# Altium PCB da12_v100.PcbDoc (part 3 of 5)
Units mil, origin at the board's own origin, x right, y up, seen from the top; angles counter-clockwise.
Board outline 4646.03 x 3622.4 mil, 4 copper layers (Top Layer, GND, POWER, Bottom Layer), stack 23.756 mil thick; 376 components, 191 nets, 1000 pads, 352 vias.
Unrouted connection lines stored in the file: 152.
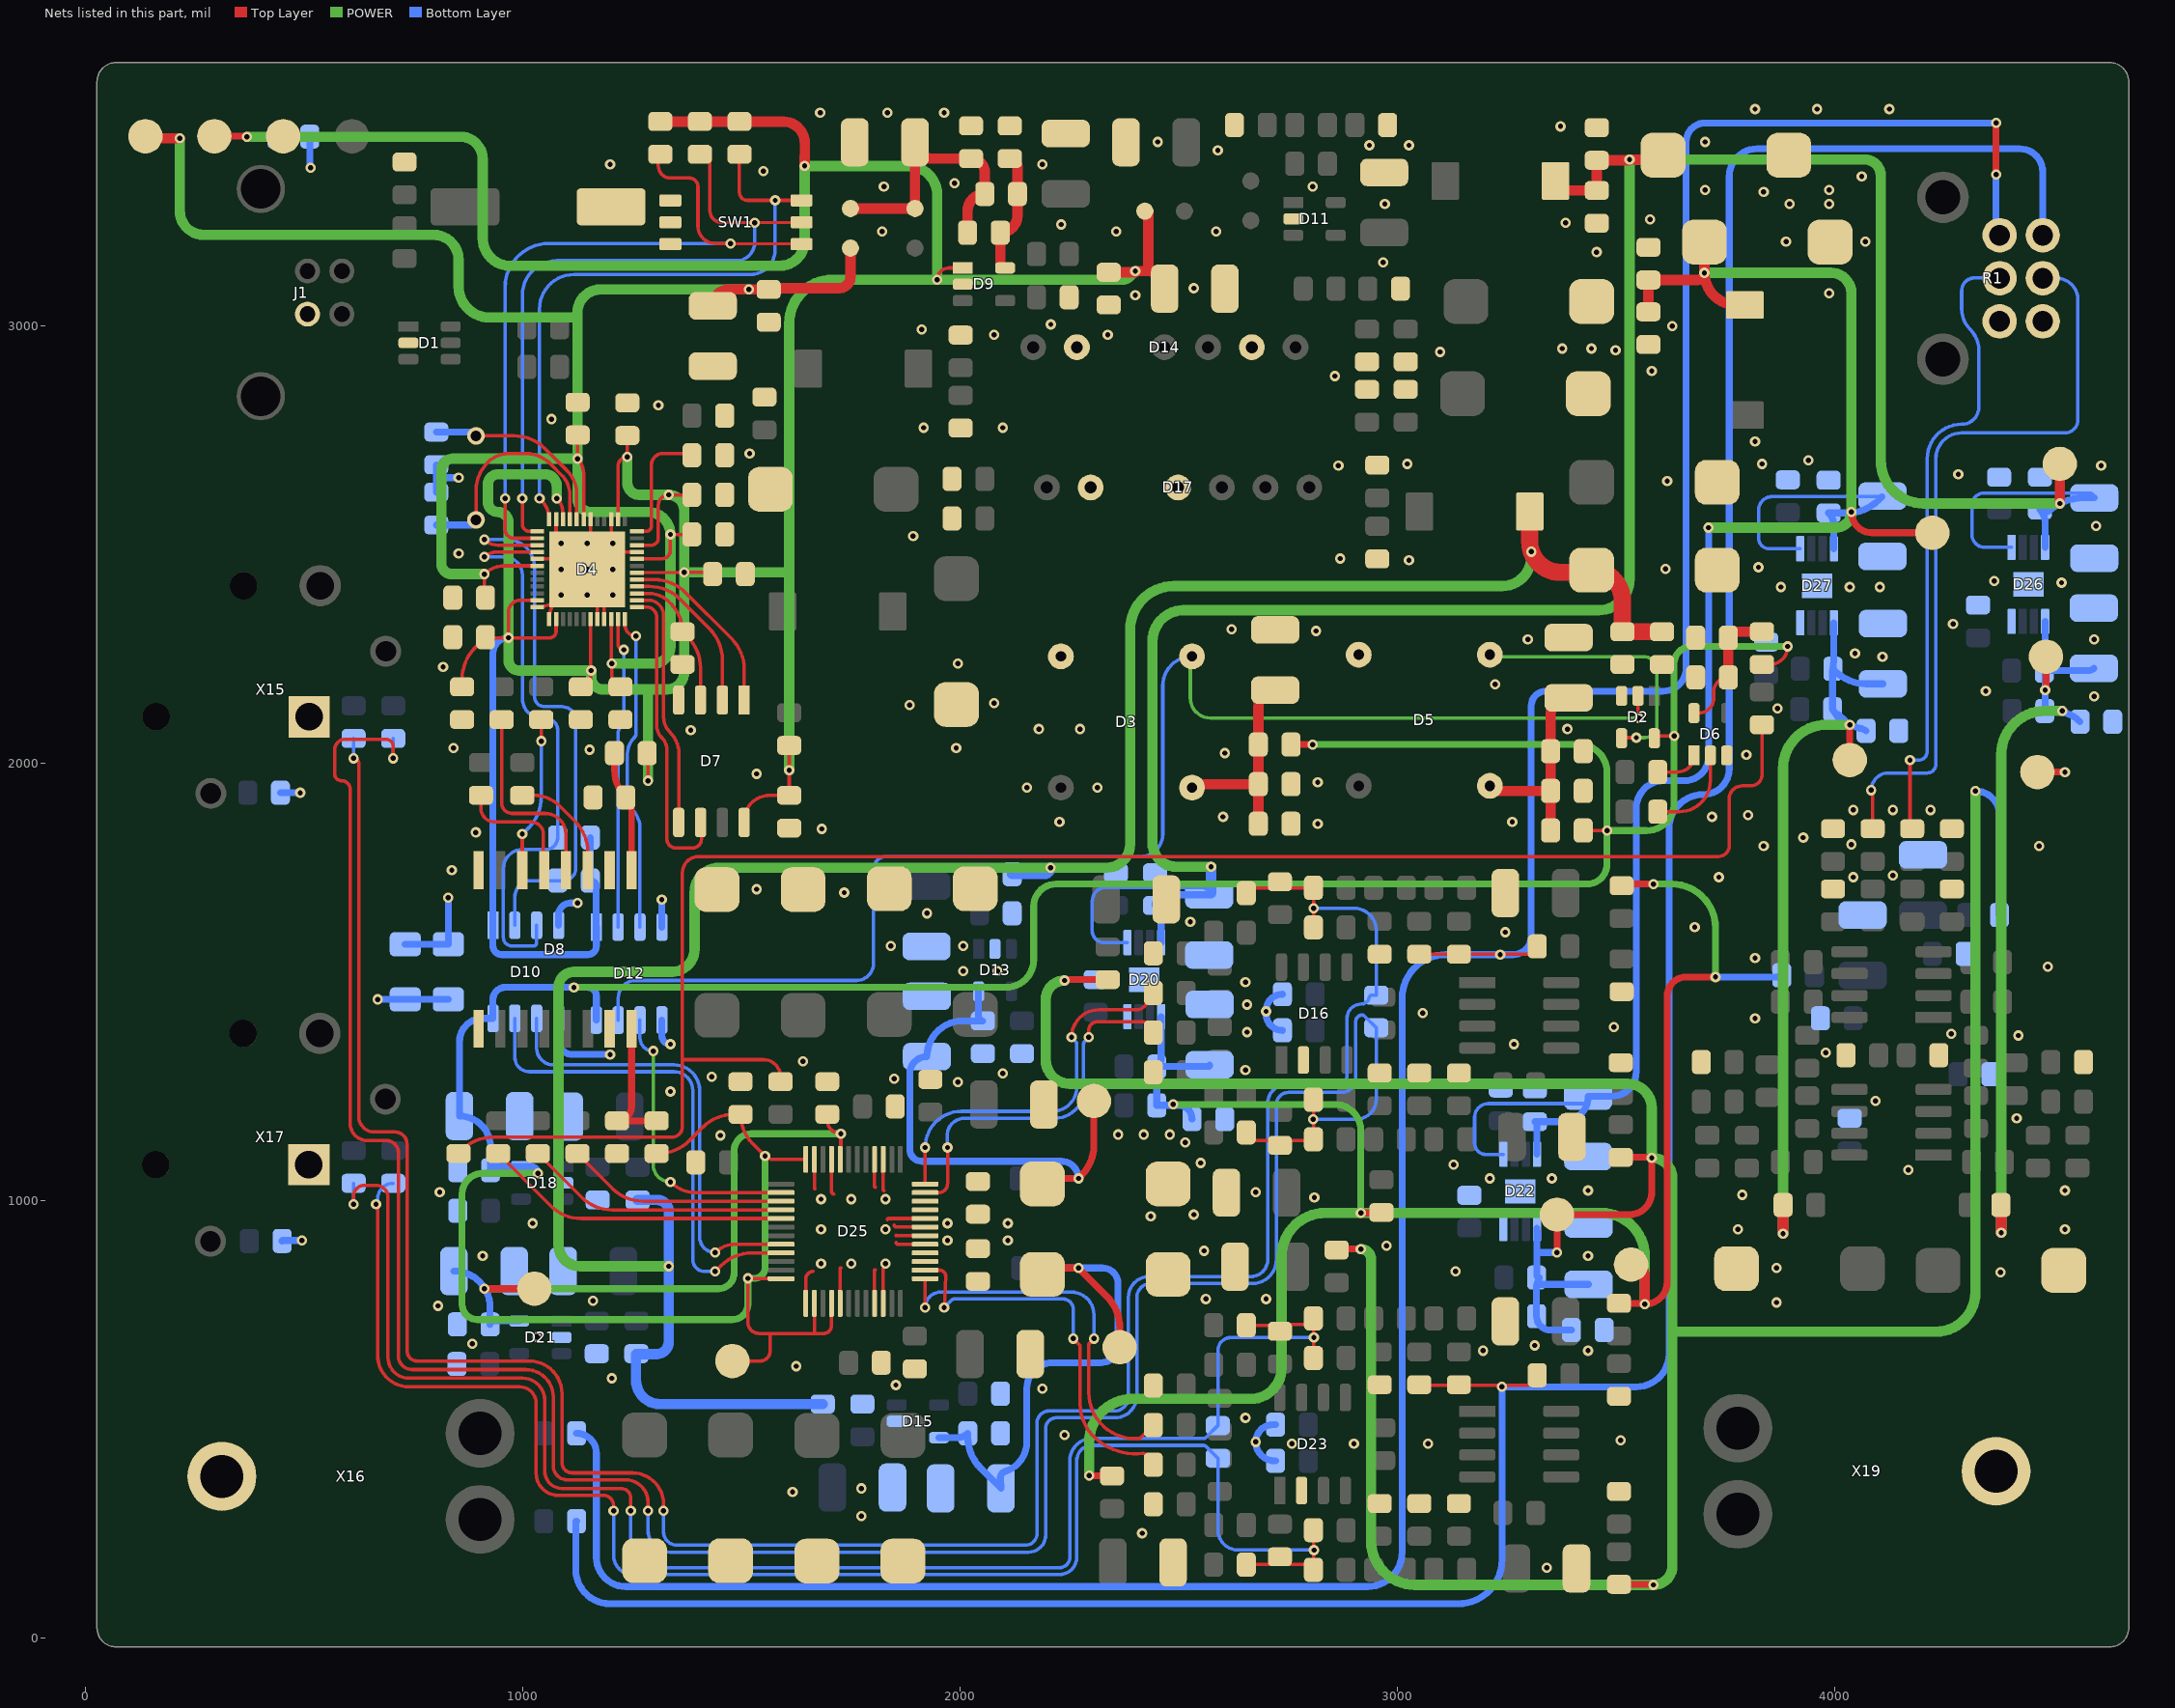
[diagram p4: the nets of this part, all layers, seen from the top]

## Part data (continued)
R85 R89 R92 R93 R94 R96: "Chip Resistor Surface Mount 0805 100 Ом", Case Code (Imperial)=0805, Case Code (Metric)=2012, Manufacturer 1=Yageo, Max Operating Temperature=155°C, Max Power Dissipation=125mW, Min Operating Temperature=-55°C, Resistance=100R, Resistance Tolerance=5%, Resistor Type="Thick Film", Temperature Coefficient=100ppm/°C, Voltage Rating=150V, Case/Package=0805, Category="Chip SMD Resistors", Contact Plating=Tin,Matte,Lead, Features="Moisture Resistant", Lead Free="Lead Free", Manufacturer Part Number 1=RC0805JR-07100RL, Mount=SMT, Number of Terminations=2, Packaging="Tape and Reel", Power Rating=125mW, Pricing 1="5000=0,00202, 10000=0,00199, 20000=0,00193 (USD)", Radiation Hardening=No, REACH SVHC=Unknown, RoHS=Yes, RoHS Compliant=Yes, Series=RC, Size Code=0805, Stock 1=585000, Supplier 1=Avnet, Supplier Part Number 1=RC0805JR-07100RL, Termination=SMD/SMT, Tolerance=5%, Type=Резистор
R91 R95: "Chip Resistor Surface Mount 0805 0 Ом", Case Code (Imperial)=0805, Case Code (Metric)=2012, Manufacturer 1=Yageo, Max Operating Temperature=155°C, Max Power Dissipation=125mW, Min Operating Temperature=-55°C, Resistance=0mR, Resistance Tolerance=5%, Resistor Type="Thick Film", Supplier Part Number 1=311-0.0ARCT-ND, Temperature Coefficient=200ppm/°C, Voltage Rating=150V, Case/Package=0805, Category="Chip SMD Resistors", ComponentLink1Description=https://datasheet.ciiva.com/7941/1738694-7941861.pdf?src-supplier=Element14, ComponentLink1URL=https://datasheet.ciiva.com/7941/1738694-7941861.pdf?src-supplier=Element14, ComponentLink2Description=https://datasheet.ciiva.com/11819/0900766b8106beab-11819430.pdf?src-supplier=RSComponents, ComponentLink2URL=https://datasheet.ciiva.com/11819/0900766b8106beab-11819430.pdf?src-supplier=RSComponents, ComponentLink3Description=https://datasheet.ciiva.com/7941/1738694-7941862.pdf?src-supplier=Element14, ComponentLink3URL=https://datasheet.ciiva.com/7941/1738694-7941862.pdf?src-supplier=Element14, ComponentLink4Description=https://datasheet.ciiva.com/7941/1738694-7941863.pdf?src-supplier=Element14, ComponentLink4URL=https://datasheet.ciiva.com/7941/1738694-7941863.pdf?src-supplier=Element14, ComponentLink5Description=https://datasheet.ciiva.com/15190/getdatasheetpartid-330685-15190028.pdf?src-supplier=Verical, ComponentLink5URL=https://datasheet.ciiva.com/15190/getdatasheetpartid-330685-15190028.pdf?src-supplier=Verical, Construction=Rectangular, Contact Plating=Tin,Matte, Depth=1.25mm, Features="Moisture Resistant", Height=0.5mm, Lead Free="Lead Free", Length=2mm, Manufacturer Part Number 1=RC0805JR-070RL, Military Standard=Not, Mount=SMT, Number of Pins=2, Number of Terminations=2, Packaging="Tape and Reel", Power Rating=125mW, Pricing 1="1=0,10000, 10=0,03100, 25=0,02240, 50=0,01720, 100=0,01260, 250=0,00964, 500=0,00770, 1000=0,00567 (USD)", Radiation Hardening=No, REACH SVHC=Unknown, RoHS=Yes, RoHS Compliant=Yes, Series=RC, Size Code=0805, Stock 1=3016838, Supplier 1=Digi-Key, Technology="THICK FILM", Termination=SMD/SMT, Tolerance=5%, Type=Резистор, Voltage Rating (DC)=150V, Width=1.25mm
SW1: library part CMP-011-00012-1, "WS-DISV 1.27 mm small compact SMD Dip Switch with top tape", ComponentLink1Description="Manufacturer URL", ComponentLink1URL=http://www.we-online.com, ComponentLink2Description=Datasheet, ComponentLink2URL=http://katalog.we-online.de/em/datasheet/4161311608xx.pdf, Pins=6
X1 X2 X3 X4 X5 X6 X8 X9 X10 X11 X12 X13 X14 X20 X21: "Контрольная площадка", Case/Package=SMD-1, Mount=SMT, Type="Точка контрольная"
  X1 X9 X10: Marck-2=5V0
  X2: Marck-2=1V2
  X3 X6 X8: Marck-2=3V3
  X4: Marck-2=DGND
  X5: Marck-2=AGND
  X11: Marck-2=6V0
  X12: Marck-2=-6V0
  X13: Marck-2=9V0
  X14: Marck-2=-9V0
  X20 X21: Marck-2="\"*\""
X7: library part HC-49, "Описание свойств компонента"
X15 X17: library part NC3FAAH2, "Описание свойств компонента"
X16 X19: library part ST-008G-04, "Описание свойств компонента"

## Via types
v1: diameter 23.62, hole 11.81, Top Layer to Bottom Layer, tented both sides, 218 vias
v2: diameter 23.62, hole 11.81, Top Layer to Bottom Layer, 134 vias

## Nets (pads, with @x,y where several pads share a name; then routed paths per layer and width w, separated by ;. In a path a pad name is that pad's centre, name@x,y a point inside that pad or via, vN(x,y) a via of type N, cw(c..) or ccw(c..) an arc to the next point about the centre after c; other vN are vias at no path point)
AOUT_LN: D25.35 R50.1 | length 858
  Top Layer w7.87: D25.35@1920.87,1018.78 1951.85,1018.78 ccw(c1951.85,1039.37) 1972.44,1039.37 v1(1972.44,1122.05) ; v1(2295.28,1374.02) 2295.28,1389.76 cw(c2314.96,1389.76) 2314.96,1409.45 2418.39,1409.45 cw(c2418.39,1384.92) R50.1@2442.91,1384.92
  Bottom Layer w7.87: v1(1972.44,1122.05) 1971.68,1146.52 ccw(c1963.81,1146.27) 1971.67,1146.71 cw(c2011.45,1149.12) 2011.45,1188.98 2218.4,1188.98 ccw(c2218.4,1254.04) 2283.46,1254.04 2283.46,1358.94 cw(c2291.34,1358.94) 2285.77,1364.51 v1(2295.28,1374.02)
AOUT_LP: D25.36 R35.1 | length 872.7
  Top Layer w7.87: D25.36@1920.87,1038.46 1921.26,1038.46 v1(1921.26,1122.05) ; v1(2255.91,1374.02) cw(c2318.9,1374.02) 2318.9,1437.01 2404.45,1437.01 ccw(c2404.45,1461.69) 2429.13,1461.69 cw(c2442.91,1461.69) R35.1@2442.91,1475.47
  Bottom Layer w7.87: v1(1921.26,1122.05) cw(c2003.94,1122.05) 2003.94,1204.72 2212.6,1204.72 ccw(c2212.6,1259.84) 2267.72,1259.84 2267.72,1358.94 ccw(c2259.84,1358.94) 2265.41,1364.51 v1(2255.91,1374.02)
AOUT_RN: D25.26 R78.1 | length 911.1
  Top Layer w7.87: D25.26@1920.87,841.61 1953.66,841.61 cw(c1953.66,826.77) 1967.33,832.55 cw(c1960.08,829.48) 1967.95,829.13 v1(1964.66,755.94) ; v1(2259.84,685.04) 2273.28,671.6 cw(c2267.72,666.03) 2275.59,666.03 2275.59,535.85 ccw(c2381.61,535.8) 2311.14,456.59 ccw(c2403.56,560.39) 2418.88,422.26 cw(c2419.72,414.43) 2419.92,422.3 cw(c2419.33,398.76) R78.1@2442.79,396.74
  Bottom Layer w7.87: v1(1964.66,755.94) 1982,773.28 cw(c1987.57,767.72) 1987.57,775.59 2236.26,775.59 cw(c2236.26,752.01) 2259.84,752.01 v1(2259.84,685.04)
AOUT_RP: D25.25 R62.1 | length 904.1
  Top Layer w7.87: D25.25@1920.87,821.93 1920.87,791.38 v1(1921.26,755.91) ; v1(2307.09,685.04) 2297.58,675.53 ccw(c2303.15,669.97) 2295.28,669.97 2295.28,561.82 ccw(c2400.73,561.82) 2409.06,456.69 ccw(c2409.06,464.57) 2414.63,459 R62.1@2442.91,487.28
  Bottom Layer w7.87: v1(1921.26,755.91) cw(c1956.69,755.91) 1956.69,791.34 2255.32,791.34 cw(c2255.32,739.57) 2307.09,739.57 v1(2307.09,685.04)
AVDD_3V3: C109.1 C112.1 C143.2 D21.5 D25.44 X8.1 | length 1613.6
  Top Layer w7.87: C143.2@1697.24,1197.91 1697.24,1184.65 ccw(c1728.35,1184.65) v1(1728.35,1153.54) 1728.35,1096.34 cw(c1726.77,1096.34) D25.44@1726.77,1094.76
  Top Layer w15.75: v1(913.39,799.21) X8.1@1027.56,799.21
  POWER w15.75: v1(913.39,799.21) 1448.82,799.21 ccw(c1448.82,834.65) 1484.25,834.65 1484.25,1114.17 cw(c1523.62,1114.17) 1523.62,1153.54 v1(1728.35,1153.54)
  Bottom Layer w15.75: C112.1@843.5,839.57 cw(c843.5,756.89) 926.18,756.89 C109.1@926.18,717.52 cw(c934.06,717.52) 934.06,725.39 D21.5@992.91,725.39
AVDD_5V0_L: C56.1 C62.1 C146.1 C147.1 D13.5 D25.33 D25.34 R77.2 X9.1 | length 1240.3
  Top Layer w15.75: C147.1@2189.37,1038.46 cw(c2220.07,1007.76) 2220.07,1051.18 v1(2271.65,1051.18) 2277.8,1057.32 ccw(c2207.09,1128.04) 2307.09,1128.04 X9.1@2307.09,1228.35
  Bottom Layer w15.75: D13.5@2043.31,1479.13 2043.31,1421.26 ccw(c2053.15,1421.26) C56.1@2053.15,1411.42 2006.89,1411.42 ccw(c2006.89,1329.72) C62.1@1925.2,1329.72 ccw(c1925.2,1290.35) 1885.83,1290.35 1885.83,1118.11 ccw(c1913.39,1118.11) 1913.39,1090.55 2232.28,1090.55 cw(c2232.28,1051.18) v1(2271.65,1051.18) R77.2@2210.63,1051.18
AVDD_5V0_R: C80.1 C83.1 C148.1 C149.2 D15.5 D25.27 D25.28 R97.1 X10.1 | length 1353.6
  Top Layer w15.75: C148.1@2189.37,831.77 cw(c2224.82,796.32) 2224.82,846.46 v1(2271.65,846.46) 2336.85,781.26 cw(c2266.14,710.55) 2366.14,710.55 X10.1@2366.14,665.35
  Bottom Layer w15.75: D15.5@1952.92,458.66 1994.94,458.66 ccw(c1994.94,492.26) C80.1@2018.7,468.5 2018.7,459.73 ccw(c2118.7,459.73) 2047.99,389.02 C83.1@2094.49,342.52 2093.04,365.37 2093.03,365.45 cw(c2108.75,366.37) 2104.04,381.39 ccw(c2083.28,448.52) 2153.54,448.52 2153.54,570.87 cw(c2212.6,570.87) 2212.6,629.92 2322.83,629.92 ccw(c2322.83,669.29) 2362.2,669.29 2362.2,811.02 ccw(c2326.77,811.02) 2326.77,846.46 v1(2271.65,846.46) R97.1@2214.57,846.46
AVDD_6V0_N: C113.1 C114.1 C116.2 D22.1 R34.1 R56.1 R58.2 R60.1 R84.1 R114.2 X12.1 | length 7603.2
  Top Layer w15.75: v1(2240.16,1503.94) cw(c2242.13,1503.94) 2242.13,1505.91 R34.1@2338.58,1505.91 ; R60.1@2862.2,887.8 cw(c2864.17,887.8) 2864.17,889.76 v1(2917.32,889.76) ; v1(3366.14,881.89) X12.1@3366.14,968.5 3531.5,968.5 ccw(c3531.5,1019.69) 3582.68,1019.69 v1(3582.68,1098.43) ccw(c3581.61,1098.43) 3581.61,1099.49 R56.1@3511.81,1099.49 ; R84.1@3507.87,123.11 3584.05,123.11 cw(c3584.05,119.48) v1(3586.61,122.05)
  POWER w23.62: v1(2240.16,1503.94) ccw(c2240.16,1460.63) 2196.85,1460.63 2196.85,1322.83 ccw(c2251.97,1322.83) 2251.97,1267.72 3527.56,1267.72 cw(c3527.56,1212.6) 3582.68,1212.6 v1(3582.68,1098.43) cw(c3582.68,1051.18) 3629.92,1051.18 3629.92,704.72 ; v1(2917.32,889.76) cw(c2917.32,866.14) 2940.94,866.14 2940.94,222.05 ccw(c3040.94,222.05) 3040.94,122.05 v1(3586.61,122.05) ccw(c3586.61,165.35) 3629.92,165.35 3629.92,704.72 ; v1(4322.83,1937.01) 4322.83,791.34 cw(c4232.28,791.34) 4232.28,700.79 3633.86,700.79 cw(c3633.86,704.72) 3629.92,704.72
  Bottom Layer w15.75: C113.1@3320.46,810.78 3324.83,822.71 3325.51,824.56 cw(c3325.51,829.78) 3320.29,829.78 3320.29,883.36 ; D22.1@3321.86,927.7 3321.86,915.88 D22.1@3320.29,936.95 3320.29,883.36 ; v1(3366.14,881.89) 3321.76,881.89 cw(c3321.76,883.36) 3320.29,883.36 ; C114.1@3399.03,704.66 3350.8,704.66 cw(c3350.8,736.16) R58.2@3319.31,736.16 3319.31,805.06 cw(c3323.24,805.06) 3323.24,808.99 3325.51,808.99 C116.2@3438.4,808.99 ; v1(4322.83,1937.01) cw(c4322.83,1881.89) 4377.95,1881.89 R114.2@4377.95,1653.54
AVDD_6V0_P: C98.1 C99.1 C104.1 D20.1 R33.1 R54.2 R55.1 R59.1 R82.1 R111.2 X11.1 | length 4678.8
  Top Layer w15.75: v1(2295.95,371.68) 2348.43,371.68 R82.1@2348.43,371.14 ; v1(2917.32,972.42) 2963.48,972.42 ccw(c2963.48,973.5) R55.1@2964.57,973.5 ; R59.1@3507.87,765.75 3564.96,765.75 cw(c3564.96,763.78) v1(3566.93,763.78) ccw(c3566.93,814.96) 3618.11,814.96 3618.11,1468.5 cw(c3661.42,1468.5) 3661.42,1511.81 v1(3728.35,1511.81) ; R33.1@3513.78,1720.47 cw(c3517.72,1720.47) 3517.72,1724.41 v1(3586.61,1724.41)
  Top Layer w23.62: X11.1@3535.43,854.33 3550.18,849.84 cw(c3543.31,827.24) 3566.93,827.24 v1(3566.93,763.78)
  POWER w15.75: v1(2488.19,1220.47) 2858.27,1220.47 cw(c2858.27,1161.42) 2917.32,1161.42 v1(2917.32,972.42) ; v1(3586.61,1724.41) 3628.4,1724.39 cw(c3628.35,1624.39) 3629.92,1724.38 cw(c3628.35,1624.39) 3728.35,1624.39 v1(3728.35,1511.81)
  POWER w23.62: v1(2295.95,371.68) 2295.95,447.24 cw(c2395.95,447.24) 2395.95,547.24 2665.35,547.24 ccw(c2665.35,618.11) 2736.22,618.11 2736.22,872.42 cw(c2836.22,872.42) 2836.22,972.42 v1(2917.32,972.42) 3466.93,972.42 cw(c3466.93,872.42) 3566.93,872.42 v1(3566.93,763.78)
  Bottom Layer w15.75: D20.1@2460.63,1421.26 2460.63,1323.45 cw(c2444.88,1323.45) 2456.02,1312.32 C98.1@2450.79,1307.09 ; C99.1@2531.5,1187.01 ccw(c2500,1187.01) 2500,1218.5 R54.2@2450.79,1218.5 C98.1@2450.79,1307.09 ; C104.1@2571.85,1311.02 cw(c2567.91,1311.02) 2567.91,1307.09 C98.1@2450.79,1307.09 ; v1(3728.35,1511.81) 3868.23,1511.81 R111.2@3879.92,1515.75
AVDD_9V0_N: C65.2 C66.2 C67.2 C119.2 C121.1 C164.2 C165.1 D22.5 D22.8 D27.5 D27.8 L16.2 X14.1 | length 4679.6
  Top Layer w15.75: v1(4039.37,2574.8) ccw(c4086.61,2574.8) 4086.61,2527.56 X14.1@4224.41,2527.56
  Top Layer w23.62: C66.2@3575.2,3032.67 C67.2@3575.2,3105.51 3686.82,3105.51 ccw(c3686.82,3121.85) v1(3703.15,3121.85) ; C65.2@3703.15,3192.13 v1(3703.15,3121.85) ; L16.2@3795.67,3048.43 3776.57,3048.43 cw(c3776.57,3121.85) v1(3703.15,3121.85)
  POWER w23.62: v1(3703.15,3121.85) 3703.15,3122.05 3992.13,3122.05 cw(c3992.13,3074.8) 4039.37,3074.8 v1(4039.37,2574.8) cw(c4003.94,2574.8) 4003.94,2539.37 v1(3712.6,2539.37)
  Bottom Layer w7.87: D22.5@3243.52,1106.24 3203.16,1106.24 cw(c3203.16,1131.83) 3177.57,1131.83 3177.57,1190.88 cw(c3209.07,1190.88) 3209.07,1222.38 3425.41,1222.38 cw(c3425.41,1215.42) C119.2@3432.36,1215.42 ; D27.5@3922.24,2491.14 3851.38,2491.14 cw(c3851.38,2515.75) 3826.77,2515.75 3826.77,2578.74 cw(c3858.27,2578.74) 3858.27,2610.24 4109.25,2610.24 ccw(c4109.25,2611.22) C164.2@4110.24,2611.22
  Bottom Layer w15.75: D22.8@3320.29,1106.24 3320.29,1176.12 ccw(c3315.37,1176.12) C121.1@3315.37,1181.04 3379.35,1181.04 ccw(c3379.35,1239.11) C119.2@3437.42,1239.11 3491.08,1239.11 ccw(c3491.08,1295.28) 3547.24,1295.28 3547.24,1897.64 cw(c3610.24,1897.64) 3610.24,1960.63 3657.48,1960.63 ccw(c3657.48,2015.75) 3712.6,2015.75 v1(3712.6,2539.37) ; D27.8@3999.02,2491.14 3999.02,2544.32 ccw(c3958.69,2544.32) C165.1@3987.2,2572.83 4030.43,2572.83 ccw(c4030.43,2672.83) 4101.14,2602.12 C164.2@4109.25,2610.24
AVDD_9V0_P: C48.1 C49.1 C51.1 C105.1 C106.1 C158.1 C159.1 D20.5 D20.8 D26.5 D26.8 L13.2 X13.1 | length 6348.1
  Top Layer w23.62: L13.2@3362.6,3331.89 ccw(c3384.25,3331.89) 3384.25,3310.24 C48.1@3457.09,3310.24 C49.1@3457.09,3379.13 3529.92,3379.13 ccw(c3529.92,3381.1) v1(3531.89,3381.1) 3598.82,3381.1 ccw(c3598.82,3390.94) C51.1@3608.66,3390.94 ; v1(4515.75,2594.49) X13.1@4515.75,2685.04
  POWER w23.62: v1(2574.8,1763.78) 2496.06,1763.78 cw(c2496.06,1818.9) 2440.94,1818.9 2440.94,2279.53 cw(c2511.81,2279.53) 2511.81,2350.39 3460.63,2350.39 ccw(c3460.63,2421.65) 3531.89,2421.65 v1(3531.89,3381.1) 4069.27,3381.1 cw(c4069.27,3344.08) 4106.3,3344.08 4106.3,2692.91 ccw(c4204.72,2692.91) 4204.72,2594.49 v1(4515.75,2594.49)
  Bottom Layer w7.87: 2333.98,1716.53 ccw(c2333.77,1724.4) 2335.36,1716.69 ; D20.5@2383.86,1590.55 2330.71,1590.55 cw(c2330.71,1618.11) 2303.15,1618.11 2303.15,1685.04 cw(c2334.65,1685.04) 2333.94,1716.53 2554.14,1716.53 cw(c2554.14,1699.8) C105.1@2570.87,1699.8 ccw(c2570.87,1703.74) C105.1@2574.8,1703.74 ; D26.5@4405.51,2494.09 4344.49,2494.09 cw(c4344.49,2523.62) 4314.96,2523.62 4314.96,2590.55 cw(c4342.52,2590.55) 4342.52,2618.11 4583.66,2618.11 cw(c4583.66,2607.28) C158.1@4594.49,2607.28
  Bottom Layer w15.75: D20.8@2460.63,1590.55 2460.63,1661.42 ccw(c2446.85,1661.42) C106.1@2446.85,1675.2 cw(c2471.46,1675.2) 2471.46,1699.8 C105.1@2570.87,1699.8 ; D26.8@4482.28,2494.09 4482.28,2551.21 ccw(c4441.96,2551.21) C159.1@4470.47,2579.72 4477.47,2576.83 4477.54,2576.8 ccw(c4483.5,2591.37) 4493.67,2579.35 cw(c4569.58,2490.15) 4569.58,2607.28 C158.1@4594.49,2607.28
  Bottom Layer w23.62: C105.1@2574.8,1703.74 v1(2574.8,1763.78)
AVDD_HA_8V0_N: C161.1 C162.1 C163.2 D27.1 R101.2 R110.2 X21.1 | length 1839.5
  Top Layer w15.75: X21.1@4035.43,2007.87 v1(4035.43,2088.58)
  Top Layer w23.62: v1(3882.87,925.2) 3882.87,990.42 R110.2@3883.03,990.58
  POWER w23.62: v1(3882.87,925.2) 3882.87,1988.58 cw(c3982.87,1988.58) 3982.87,2088.58 v1(4035.43,2088.58)
  Bottom Layer w15.75: C161.1@3996.06,2211.38 R101.2@3996.06,2124.02 4007.76,2106.42 4007.76,2112.14 cw(c4002,2097.49) 4012.48,2109.24 4035.37,2088.64 cw(c4024.9,2076.88) v1(4035.43,2088.58) 4055.64,2081.14 ccw(c4061.06,2095.92) 4061.06,2080.17 4061.57,2080.17 C162.1@4072.83,2074.8 ; D27.1@3999.02,2321.85 3999.02,2233.7 C161.1@3997.05,2216.54 4002.21,2211.38 ccw(c4072.92,2282.09) 4072.92,2182.09 C163.2@4111.22,2182.09
AVDD_HA_8V0_P: C155.1 C156.1 C157.1 D26.1 R98.2 R106.2 X20.1 | length 1837.9
  Top Layer w15.75: v1(4482.28,2167.53) ccw(c4482.28,2169.5) 4484.25,2169.5 X20.1@4484.25,2244.09
  Top Layer w23.62: R106.2@4381.07,990.58 cw(c4379.08,988.6) 4381.89,988.6 v1(4381.89,927.17)
  POWER w23.62: v1(4381.89,927.17) 4381.89,2020.08 cw(c4481.89,2020.08) 4481.89,2120.08 v1(4521.65,2120.08)
  Bottom Layer w15.75: C155.1@4480.31,2212.6 C155.1@4482.28,2212.6 ; D26.1@4482.28,2324.8 C155.1@4482.28,2212.6 ; C156.1@4562.01,2095.47 ccw(c4502.6,2036.07) 4502.6,2120.08 R98.2@4481.3,2120.08 ccw(c4478.92,2122.45) 4482.28,2122.45 v1(4482.28,2167.53) C155.1@4482.28,2212.6 ; C157.1@4593.5,2217.52 cw(c4581.62,2229.4) 4581.62,2212.6 C155.1@4482.28,2212.6
CONN_SE_L: C71.2 R1.1 R39.2 R44.2 R92.1 | length 7283.8
  Top Layer w7.87: R39.2@3051.18,1564.05 C71.2@3141.73,1564.05 3303.15,1564.05 ccw(c3303.15,1581.77) R44.2@3320.87,1581.77
  Top Layer w15.75: v1(4370.08,3346.46) v1(4370.08,3464.57)
  Bottom Layer w7.87: R1.1@4370.08,3219.4 ccw(c4377.95,3219.4) 4372.38,3213.84 R1.1@4378.35,3207.87
  Bottom Layer w15.75: R92.1@1124.02,468.5 cw(c1124.02,423.23) 1169.29,423.23 1169.29,185.04 ccw(c1236.22,185.04) 1236.22,118.11 2933.07,118.11 ccw(c2933.07,196.85) 3011.81,196.85 3011.81,1462.99 cw(c3111.81,1462.99) 3111.81,1562.99 v1(3236.22,1562.99) 3265.33,1562.99 ccw(c3265.33,1604.75) 3307.09,1604.75 3307.09,2131.65 cw(c3340.79,2131.65) 3340.79,2165.35 3608.43,2165.35 ccw(c3608.43,2218.34) 3661.42,2218.34 3661.42,3421.06 cw(c3704.92,3421.06) 3704.92,3464.57 v1(4370.08,3464.57) ; R1.1@4370.08,3219.4 v1(4370.08,3346.46)
CONN_SE_R: C126.2 R1.6 R66.2 R71.2 R96.1 | length 7134.7
  Top Layer w7.87: R66.2@3051.18,579.8 3061.93,579.8 cw(c3061.93,578.74) 3062.99,578.74 3298.15,578.74 ccw(c3298.15,601.46) R71.2@3320.87,601.46
  Bottom Layer w15.75: R96.1@1124.02,267.72 ccw(c1124.02,265.75) 1122.05,265.75 1122.05,157.48 ccw(c1200.79,157.48) 1200.79,78.74 3140.16,78.74 ccw(c3140.16,178.74) 3240.16,178.74 v1(3240.16,574.8) 3547.24,574.8 ccw(c3547.24,649.61) 3622.05,649.61 3622.05,1850.39 cw(c3700.79,1850.39) 3700.79,1929.13 ccw(c3700.79,1988.19) 3759.84,1988.19 3759.84,3342.09 cw(c3823.26,3342.09) 3823.26,3405.51 4424.04,3405.51 cw(c4424.04,3352.78) 4476.77,3352.78 R1.6@4476.77,3207.87
CONN_XLR_LN: C79.1 C91.2 R45.1 R48.1 R52.2 R89.1 | length 6015.3
  Top Layer w7.87: v1(704.72,2011.81) 704.72,2039.37 ccw(c688.98,2039.37) 688.98,2055.12 594.49,2055.12 ccw(c594.49,2031.5) 570.87,2031.5 570.87,1976.38 ccw(c586.61,1976.38) 586.61,1960.63 cw(c586.61,1940.94) 606.3,1940.94 606.3,1177.17 ccw(c645.67,1177.17) 645.67,1137.8 688.98,1137.8 cw(c688.98,1110.24) 716.54,1110.24 716.54,645.67 ccw(c748.03,645.67) 748.03,614.17 1007.87,614.17 cw(c1007.87,551.18) 1070.87,551.18 1070.87,393.7 ccw(c1102.36,393.7) 1102.36,362.2 1236.22,362.2 cw(c1236.22,311.02) 1287.4,311.02 v1(1287.4,291.34) ; R52.2@2655.51,1156.57 ccw(c2673.78,1156.57) 2673.78,1138.31 2806.54,1138.31 ccw(c2806.54,1140.83) R45.1@2809.06,1140.83 R48.1@2809.06,1231.38
  Bottom Layer w7.87: v1(704.72,2011.81) R89.1@704.72,2057.09 ; v1(1287.4,291.34) 1287.4,247.39 ccw(c1337.94,247.39) 1337.94,196.85 2157.48,196.85 ccw(c2157.48,236.22) 2196.85,236.22 2196.85,480.31 cw(c2220.47,480.31) 2220.47,503.94 2354.33,503.94 ccw(c2354.33,555.12) 2405.51,555.12 2405.51,779.53 cw(c2437.01,779.53) 2437.01,811.02 2669.29,811.02 ccw(c2669.29,866.14) 2724.41,866.14 2724.41,1220.47 cw(c2751.97,1220.47) 2751.97,1248.03 2874.02,1248.03 ccw(c2874.02,1279.53) 2905.51,1279.53 2905.51,1409.45 cw(c2921.26,1409.45) 2918.87,1425.01 cw(c2920.06,1417.23) 2925.63,1422.8 C79.1@2952.76,1395.67 2952.76,1232.28 cw(c2907.29,1232.28) 2907.29,1186.82 v1(2808.7,1186.82)
CONN_XLR_LP: C68.2 C79.2 R37.2 R40.2 R41.1 R85.1 | length 5757.6
  Top Layer w7.87: v1(614.17,2011.81) cw(c614.17,2000) 625.98,2000 625.98,1192.91 ccw(c661.42,1192.91) 661.42,1157.48 708.66,1157.48 cw(c708.66,1129.92) 736.22,1129.92 736.22,657.48 ccw(c759.84,657.48) 759.84,633.86 1015.75,633.86 cw(c1015.75,559.06) 1090.55,559.06 1090.55,401.57 ccw(c1114.17,401.57) 1114.17,377.95 1251.97,377.95 cw(c1251.97,307.09) 1322.83,307.09 v1(1322.83,291.34) ; R37.2@2655.51,1703.82 cw(c2667.32,1703.82) 2667.32,1715.63 R41.1@2809.06,1715.63 R40.2@2809.06,1625.08
  Bottom Layer w7.87: v1(614.17,2011.81) R85.1@614.17,2057.09 ; v1(1322.83,291.34) 1322.83,244.09 ccw(c1354.33,244.09) 1354.33,212.6 2149.61,212.6 ccw(c2149.61,240.16) 2177.17,240.16 2177.17,492.13 cw(c2204.72,492.13) 2204.72,519.69 2354.33,519.69 ccw(c2354.33,551.18) 2385.83,551.18 2385.83,779.53 cw(c2433.07,779.53) 2433.07,826.77 2665.35,826.77 ccw(c2665.35,866.14) 2704.72,866.14 2704.72,1224.41 cw(c2744.09,1224.41) 2744.09,1263.78 2862.2,1263.78 ccw(c2862.2,1287.4) 2885.83,1287.4 2885.83,1417.32 cw(c2918.41,1417.32) 2918.41,1449.9 ccw(c2918.41,1468.1) 2936.21,1464.3 cw(c2943.89,1462.6) 2943.89,1470.47 C79.2@2952.76,1470.47 2952.76,1618.11 ccw(c2901.76,1618.11) 2901.76,1669.1 v1(2809.22,1669.1)
CONN_XLR_RN: C128.2 C131.2 R72.1 R75.1 R80.2 R94.1 | length 3677.7
  Top Layer w7.87: v1(665.35,992.13) cw(c661.42,985.31) 669.29,985.31 669.29,646.22 ccw(c740.7,646.22) 740.7,574.8 994.18,574.8 cw(c994.18,537.49) 1031.5,537.49 1031.5,377.15 ccw(c1081.82,377.09) 1081.95,326.77 1185.2,326.77 cw(c1185.2,303.31) 1208.66,303.31 v1(1208.66,291.34) ; R80.2@2655.51,168.39 2797.24,168.39 cw(c2797.24,156.57) R72.1@2809.06,156.57 R75.1@2809.06,247.13
  Bottom Layer w7.87: v1(665.35,992.13) ccw(c661.42,998.95) 669.29,998.95 669.29,1004.72 cw(c704.72,1004.72) R94.1@704.72,1040.16 ; v1(1208.66,291.34) 1208.66,189.08 ccw(c1252.07,189.08) 1252.07,145.67 2228.44,145.67 ccw(c2228.44,184.94) 2267.72,184.94 2267.72,406.08 cw(c2302.58,406.08) 2302.58,440.94 2557.76,440.94 cw(c2557.76,433.07) 2563.33,438.64 C128.2@2590.55,411.42 2590.55,248.03 ccw(c2637.02,248.03) 2637.02,201.56 v1(2810.27,201.56)
CONN_XLR_RP: C123.2 C128.1 R64.2 R67.2 R68.1 R93.1 | length 3791
  Top Layer w7.87: v1(614.17,992.13) 614.17,1010.83 cw(c638.78,1010.83) 638.78,1035.43 665.35,1035.43 cw(c665.35,1007.87) 692.91,1007.87 692.91,692.18 692.91,642.24 ccw(c740.66,642.24) 740.66,594.49 1000.71,594.49 cw(c1000.71,544.02) 1051.18,544.02 1051.18,381.96 ; 1051.18,381.9 ccw(c1090.61,381.94) 1090.08,342.52 1225.59,342.52 cw(c1225.59,320.08) 1248.03,320.08 v1(1248.03,291.34) ; R64.2@2655.51,715.63 2718.5,715.63 cw(c2718.5,701.85) C123.2@2732.28,701.85 cw(c2748.03,701.85) 2748.03,717.6 2795.28,717.6 cw(c2809.06,717.6) R68.1@2809.06,731.38 R67.2@2809.06,640.83
  Bottom Layer w7.87: v1(614.17,992.13) R93.1@614.17,1040.16 ; v1(1248.03,291.34) 1248.03,188.82 ccw(c1275.44,188.82) 1275.44,161.42 2228.35,161.42 ccw(c2228.35,185.04) 2251.97,185.04 2251.97,406.08 cw(c2302.58,406.08) 2302.58,456.69 2557.76,456.69 ccw(c2557.76,464.57) 2563.33,459 C128.1@2590.55,486.22 2590.55,657.48 cw(c2620.56,657.48) 2620.56,687.49 v1(2810.16,687.49)
CPU_DAC_RESET: D4.36 D12.3 | length 731.3
  Top Layer w7.87: D4.36@1234.65,2329.92 1234.65,2316.54 ccw(c1259.84,2316.54) v1(1259.84,2291.34)
  Bottom Layer w7.87: v1(1259.84,2291.34) 1259.84,2068.56 cw(c1246.4,2068.56) 1255.91,2059.06 ccw(c1293.92,2021.04) 1240.16,2021.04 1240.16,1922.22 ccw(c1280.48,1922.22) 1251.97,1893.7 cw(c1210.62,1852.36) 1269.09,1852.36 D12.3@1269.09,1625.98
CPU_F0: D4.12 R4.1 SW1.3 | length 1456.1
  Top Layer w7.87: v1(1039.37,2606.3) 1043.04,2602.63 cw(c998.69,2558.27) D4.12@1061.42,2558.27 ; R4.1@1496.46,3392.91 1496.46,3306.16 ccw(c1515.02,3306.16) 1515.02,3287.6 v1(1578.15,3287.6) 1638.58,3287.6 SW1.3@1638.58,3287.4
  Bottom Layer w7.87: v1(1039.37,2606.3) 1039.37,3039.37 cw(c1118.11,3039.37) 1118.11,3118.11 1521.49,3118.11 ccw(c1521.49,3174.77) 1578.15,3174.77 v1(1578.15,3287.6)
CPU_F1: D4.13 R5.1 SW1.2 | length 1582.6
  Top Layer w7.87: v1(1000,2606.3) 1000,2547.24 ccw(c1016.54,2547.24) 1016.54,2530.71 D4.13@1033.86,2530.71 ; R5.1@1405.91,3392.91 1414.17,3392.91 cw(c1414.17,3377.95) 1429.13,3377.95 1429.13,3263.27 ccw(c1455,3263.27) 1454.95,3237.4 cw(c1454.94,3229.53) 1455.12,3237.4 v1(1531.5,3236.22) SW1.2@1617.48,3237.17 ; SW1.2@1617.52,3237.17 SW1.2@1638.58,3237.4
  Bottom Layer w7.87: v1(1000,2606.3) 1000,3070.87 cw(c1078.74,3070.87) 1078.74,3149.61 1489.41,3149.61 ccw(c1489.41,3191.7) 1531.5,3191.7 v1(1531.5,3236.22)
CPU_F2: D4.14 R6.1 SW1.1 | length 1708.1
  Top Layer w7.87: v1(960.63,2606.3) 960.63,2535.43 ccw(c981.1,2535.43) 981.1,2514.96 D4.14@1033.86,2514.96 ; R6.1@1315.35,3392.91 ccw(c1315.35,3388.58) 1311.02,3388.58 1311.02,3366.14 ccw(c1338.58,3366.14) 1338.58,3338.58 1381.89,3338.58 cw(c1381.89,3318.9) 1401.57,3318.9 1401.57,3228.35 ccw(c1440.94,3228.35) 1440.94,3188.98 v1(1476.38,3188.98) 1617.51,3187.61 SW1.1@1638.58,3187.4
  Bottom Layer w7.87: v1(960.63,2606.3) 960.63,3088.98 cw(c1060.63,3088.98) 1060.63,3188.98 v1(1476.38,3188.98)
CPU_I2C_DATA: D4.15 D10.2 R3.1 | length 1275.2
  Top Layer w7.87: v1(913.39,2511.81) ccw(c943.8,2542.23) 943.8,2499.21 D4.15@1033.86,2499.21
  Bottom Layer w7.87: v1(913.39,2511.81) 964.57,2511.81 cw(c964.57,2448.82) 1027.56,2448.82 1027.56,2153.54 ccw(c1051.18,2153.54) 1051.18,2129.92 1090.55,2129.92 cw(c1090.55,2098.43) 1122.05,2098.43 1122.05,1759.84 cw(c1094.49,1759.84) 1094.49,1732.28 R3.1@1080.71,1732.28 1019.69,1732.28 ccw(c1019.69,1695.47) 982.87,1695.47 D10.2@982.87,1629.92
CPU_I2C_SCK: D4.16 D10.3 R2.1 | length 1336.8
  Top Layer w7.87: v1(913.39,2472.44) cw(c940,2445.83) 940,2483.46 D4.16@1033.86,2483.46
  Bottom Layer w7.87: v1(913.39,2472.44) 958.86,2472.44 cw(c958.86,2431.3) 1000,2431.3 1000,2149.61 ccw(c1047.24,2149.61) 1047.24,2102.36 1055.12,2102.36 cw(c1055.12,2076.77) 1080.71,2076.77 R2.1@1080.71,1830.71 cw(c1053.15,1830.71) 1053.15,1803.15 1000,1803.15 ccw(c1000,1759.84) 956.69,1759.84 956.69,1602.36 ccw(c976.38,1602.36) 976.38,1582.68 1025,1582.68 ccw(c1025,1590.55) 1032.87,1590.55 D10.3@1032.87,1629.92
CPU_I2S_DATA: D8.4 R14.1 | length 460.8
  Top Layer w7.87: R14.1@952.76,2100.39 952.76,1909.45 ccw(c976.38,1909.45) 976.38,1885.83 1052.17,1885.83 cw(c1052.17,1838.58) 1099.41,1838.58 1099.41,1756.86 ccw(c1100.75,1756.86) D8.4@1099.8,1755.91
CPU_I2S_LRCK: D8.5 R13.1 | length 289.1
  Top Layer w7.87: R13.1@905.51,1927.17 905.51,1897.64 ccw(c937.01,1897.64) 937.01,1866.14 1020.67,1866.14 cw(c1020.67,1838.58) 1048.23,1838.58 1048.23,1759.71 ccw(c1053.61,1759.71) D8.5@1049.8,1755.91
CPU_I2S_MCLK: D8.6 R16.1 | length 358.2
  Top Layer w7.87: D8.6@999.8,1755.91 999.8,1838.39 v1(1000,1838.58) ; v1(1043.31,2051.18) R16.1@1043.31,2100.39
  Bottom Layer w7.87: v1(1000,1838.58) 1014.02,1852.6 ccw(c943.31,1923.31) 1043.31,1923.31 v1(1043.31,2051.18)
CPU_I2S_SCK: D8.3 R15.1 | length 261.2
  Top Layer w7.87: R15.1@1000,1927.17 1026.41,1927.17 cw(c1026.46,1843.73) 1085.5,1902.69 1120.51,1867.67 cw(c1049.8,1796.96) 1149.8,1796.96 D8.3@1149.8,1755.91
CPU_SCALE: D4.35 D12.2 | length 715.1
  Top Layer w7.87: D4.35@1218.9,2329.92 1218.9,2273.23 ccw(c1232.28,2273.23) v1(1232.28,2259.84)
  Bottom Layer w7.87: D12.2@1219.09,1625.98 1219.09,2069.85 cw(c1237.24,2069.85) 1224.41,2082.68 ccw(c1205.4,2101.69) 1232.28,2101.69 v1(1232.28,2259.84)
DAC_DVDD_3V3: C93.1 C97.1 C144.2 D2.5 D10.8 D12.8 D18.5 D25.12 D25.14 D25.16 D25.48 L2.2 L3.2 L4.2 L6.2 X6.1 | length 8042.4
  Top Layer w7.87: L6.2@1307.09,1108.27 1310.94,1108.27 ccw(c1310.94,1208.27) 1381.65,1137.56 1412.64,1168.55 cw(c1483.35,1097.83) 1483.35,1197.83 C144.2@1499.02,1197.83 ccw(c1594.06,1197.83) 1526.85,1130.63 v1(1555.12,1102.36) ccw(c1573.46,1120.71) 1573.46,1094.76 D25.48@1648.03,1094.76 ; X6.1@1480.32,633.86 1543.31,633.86 ccw(c1543.31,657.48) 1566.93,657.48 1566.93,696.85 ; D25.12@1591.73,821.93 1517.93,821.93 cw(c1517.93,825.02) v1(1515.75,822.83) 1515.75,722.45 ccw(c1541.35,722.45) 1541.35,696.85 1566.93,696.85 ; D25.14@1667.72,765.63 1667.72,698.43 ccw(c1669.29,698.43) 1669.29,696.85 ; D25.16@1707.09,765.63 1707.09,714.96 cw(c1688.98,714.96) 1688.98,696.85 1669.29,696.85 ; L3.2@3425.98,1846.85 3425.98,1846.46 v1(3480.32,1846.46) ; D2.5@3588.58,2057.87 cw(c3593.7,2057.87) 3593.7,2062.99 v1(3633.86,2062.99) ; L4.2@3834.65,2226.38 3852.36,2226.38 ccw(c3852.36,2267.72) v1(3893.7,2267.72) ; 1566.93,696.85 1669.29,696.85
  Top Layer w15.75: L2.2@2757.87,2043.31 v1(2807.09,2043.31)
  POWER w15.75: v1(1035.43,1062.99) 909.45,1062.99 ccw(c909.45,1015.75) 862.2,1015.75 862.2,763.78 ccw(c897.64,763.78) 897.64,728.35 1480.32,728.35 ccw(c1480.32,763.78) 1515.75,763.78 v1(1515.75,822.83) 1530.21,822.83 ccw(c1530.21,847.74) 1555.12,847.74 v1(1555.12,1102.36) ; v1(1118.11,1488.19) 2106.3,1488.19 ccw(c2106.3,1551.18) 2169.29,1551.18 2169.29,1673.23 cw(c2220.47,1673.23) 2220.47,1724.41 3434.53,1724.41 ccw(c3434.53,1770.2) 3480.32,1770.2 v1(3480.32,1846.46) ; v1(2807.09,2043.31) 3417.32,2043.31 cw(c3417.32,1980.32) 3480.32,1980.32 v1(3480.32,1846.46) ; v1(3893.7,2267.72) 3673.12,2267.72 ccw(c3673.12,2228.46) 3633.86,2228.46 v1(3633.86,2062.99) 3633.86,1909.45 cw(c3570.87,1909.45) 3570.87,1846.46 v1(3480.32,1846.46)
  Bottom Layer w15.75: v1(1035.43,1062.99) ccw(c1019.68,1062.99) 1019.68,1078.74 D18.5@996.85,1078.74 936.02,1078.74 ccw(c936.02,1069.88) C93.1@927.17,1069.88 927.17,1123.03 ccw(c856.3,1123.03) C97.1@856.3,1193.9 856.3,1364.17 cw(c909.45,1364.17) 909.45,1417.32 D10.8@932.87,1417.32 932.87,1460.43 cw(c960.63,1460.43) 960.63,1488.19 v1(1118.11,1488.19) 1149.61,1488.19 cw(c1149.61,1468.5) 1169.29,1468.5 1169.29,1413.39 D12.8@1169.09,1413.39
DAC_DVDD_9V0: C76.1 C77.1 C84.1 L15.1 L17.2 L18.1 L20.1 L21.1 | length 5546
  Top Layer w39.37: L17.2@3303.54,2575.98 3303.54,2507.48 ccw(c3374.02,2507.48) 3374.02,2437.01 3440.16,2437.01 ccw(c3440.16,2442.13) C84.1@3445.28,2442.13 cw(c3445.28,2371.65) 3515.75,2371.65 C77.1@3515.75,2301.18 C76.1@3606.3,2301.18
  POWER w23.62: v1(1334.65,850.39) 1132.27,850.39 cw(c1132.27,899.98) 1082.68,899.98 1082.68,1488.19 cw(c1118.11,1488.19) 1118.11,1523.62 1342.52,1523.62 ccw(c1342.52,1574.8) 1393.7,1574.8 1393.7,1704.72 cw(c1450.85,1704.72) 1450.85,1761.87 v1(2207.69,1761.87) 2336.48,1761.87 ccw(c2336.48,1815.15) 2389.76,1815.15 2389.76,2305.51 cw(c2489.76,2305.51) 2489.76,2405.51 3240.16,2405.51 ccw(c3240.16,2472.44) 3307.09,2472.44 v1(3307.09,2484.25)
  Bottom Layer w23.62: L20.1@1263.78,1001.97 1309.06,1001.97 cw(c1309.06,976.38) 1334.65,976.38 v1(1334.65,850.39) 1334.65,677.17 cw(c1307.09,677.17) 1307.09,649.61 1261.81,649.61 ccw(c1261.81,647.64) 1259.84,647.64 1259.84,590.55 ccw(c1314.96,590.55) 1314.96,535.43 L18.1@1687.01,535.43 ; L15.1@2120.08,1747.05 2192.87,1747.05 ccw(c2192.87,1761.87) v1(2207.69,1761.87)
DAC_GEN_44k: D6.1 R9.2 | length 104.5
  Top Layer w7.87: R9.2@3596.46,1980.32 3640.94,1980.32 ccw(c3640.94,2018.5) D6.1@3679.13,2018.5
DAC_GEN_48k: D6.2 R12.2 | length 218.4
  Top Layer w7.87: R12.2@3596.46,1889.76 3645.67,1889.76 ccw(c3645.67,1960.63) 3716.54,1960.63 D6.2@3716.54,2018.5
DAC_I2C_DATA: D10.7 D25.9 | length 1156.3
  Top Layer w7.87: v1(1440.94,838.58) 1454.06,851.69 cw(c1524.77,780.98) 1524.77,880.98 D25.9@1591.73,880.98
  Bottom Layer w7.87: D10.7@982.87,1417.32 982.87,1328.15 ccw(c1015.75,1328.15) 1015.75,1295.28 1346.46,1295.28 cw(c1346.46,1251.97) 1389.76,1251.97 1389.76,866.14 ccw(c1417.32,866.14) 1417.32,838.58 v1(1440.94,838.58)
DAC_I2C_SCK: D10.6 D25.8 | length 1042.4
  Top Layer w7.87: v1(1440.94,881.89) cw(c1486.28,836.55) 1486.28,900.67 D25.8@1591.73,900.67
  Bottom Layer w7.87: D10.6@1032.87,1417.32 1032.87,1349.02 ccw(c1070.87,1349.02) 1070.87,1311.02 1346.46,1311.02 cw(c1346.46,1251.97) 1405.51,1251.97 1405.51,917.32 ccw(c1440.94,917.32) v1(1440.94,881.89)
DAC_I2S_DATA: D25.4 R26.1 | length 605.4
  Top Layer w7.87: R26.1@1035.43,1108.27 1135,1008.7 ccw(c1205.71,1079.41) 1205.71,979.41 D25.4@1591.73,979.41
DAC_I2S_LRCK: D25.5 R25.1 | length 704.1
  Top Layer w7.87: R25.1@944.88,1108.27 1064.14,989.01 ccw(c1134.85,1059.72) 1134.85,959.72 D25.5@1591.73,959.72
DAC_I2S_MCLK: R17.2 R24.1 R83.1 | length 4131.4
  Top Layer w7.87: R24.1@854.84,1107.86 cw(c933.15,1045.67) 933.15,1145.67 1341.84,1145.67 ccw(c1341.84,1169.97) 1366.14,1169.97 1366.14,1322.83 ; 1366.14,1348.19 1366.14,1322.83 ; 1366.14,1348.23 1366.14,1749.94 ccw(c1358.27,1749.94) 1366.14,1750 ; 1366.14,1750.04 cw(c1403.54,1750) 1403.54,1787.4 3735.28,1787.4 3735.35,1787.4 ccw(c3735.28,1811.96) 3759.84,1811.96 3759.84,1919.29 cw(c3789.37,1919.29) 3789.37,1948.82 3809.06,1948.82 ccw(c3809.06,1974.41) 3834.65,1974.41 3834.65,2035.43 R17.2@3834.65,2088.58 ; R83.1@1590.55,1272.64 1590.55,1283.46 ccw(c1551.18,1283.46) 1551.18,1322.83 1366.14,1322.83
DAC_I2S_SCK: D25.3 R27.1 | length 506.7
  Top Layer w7.87: R27.1@1125.98,1108.27 1205.87,1028.38 ccw(c1276.58,1099.09) 1276.58,999.09 D25.3@1591.73,999.09
DAC_RESET: D12.6 D25.2 | length 669.4
  Top Layer w7.87: v1(1338.58,1043.31) ccw(c1397.8,1102.52) 1397.8,1018.78 D25.2@1591.73,1018.78
  POWER w7.87: v1(1299.21,1342.52) 1299.21,1082.68 ccw(c1338.58,1082.68) v1(1338.58,1043.31)
  Bottom Layer w7.87: D12.6@1269.09,1413.39 1269.09,1372.64 ccw(c1299.21,1372.64) v1(1299.21,1342.52)
DAC_SCALE: D2.2 D3.1 D12.7 | length 3247.9
  Top Layer w7.87: D2.2@3551.18,2154.72 3551.18,2106.4 ccw(c3553.53,2106.4) v1(3553.53,2104.05)
  POWER w7.87: D3.1@2531.5,2244.88 ccw(c2531.5,2240.94) 2527.56,2240.94 2527.56,2149.61 ccw(c2573.12,2149.61) 2573.12,2104.05 v1(3553.53,2104.05)
  Bottom Layer w7.87: D12.7@1219.09,1413.39 1219.09,1463.19 cw(c1259.84,1463.19) 1259.84,1503.94 1763.78,1503.94 ccw(c1763.78,1543.31) 1803.15,1543.31 1803.15,1758.53 cw(c1832.02,1758.53) 1832.02,1787.4 2413.39,1787.4 ccw(c2413.39,1838.58) 2464.57,1838.58 2464.57,2177.95 cw(c2531.5,2177.95) D3.1@2531.5,2244.88
DAC_SCALE_INV: D2.4 D5.1 | length 626.4
  Top Layer w7.87: D2.4@3513.78,2057.87 cw(c3514.96,2057.87) 3514.96,2059.06 v1(3547.24,2059.06)
  POWER w7.87: D5.1@3212.6,2248.82 ccw(c3217.32,2248.82) 3217.32,2244.09 3564.7,2244.09 cw(c3564.7,2214.3) 3594.49,2214.3 3594.49,2086.61 cw(c3566.93,2086.61) 3566.93,2059.06 v1(3547.24,2059.06)
DGND: C1.2 C3.2 C4.2 C8.1 C12.2 C13.1 C16.2 C17.2 C18.2 C19.2 C20.2 C21.2 C22.2 C23.2 C24.2 C25.2 C26.2 C27.2 C28.1 C30.1 C31.2 C32.1 C34.2 C35.1 C36.2 C37.1 C38.2 C39.1 C41.2 C42.1 C43.2 C44.1 C57.2 C59.2 C60.2 C86.2 C87.2 C88.2 D1.2 D4.0 D4.3 D4.6 D4.11 D4.17 D4.24 D4.25 D4.32 D4.33 D4.45 D7.4 D8.2 D8.8 D9.2 D10.4 D11.2 D12.4 D14.2 D17.2 J1.4 R10.1 R19.2 R28.2 R29.1 R31.2 SW1.4 SW1.5 SW1.6 X4.1 | length 1318.6
  Top Layer w7.87: D4.24@1033.86,2357.48 ccw(c1033.86,2424.01) D4.0@1080.85,2376.91 ; D4.17@1033.86,2467.72 1091,2467.72 cw(c1091,2387.07) D4.0@1148.03,2444.09 ; D4.25@1061.42,2329.92 cw(c1127.95,2329.92) D4.0@1080.85,2376.91 ; D4.11@1077.17,2558.27 1077.17,2531.66 ccw(c1117.49,2531.66) D4.0@1088.98,2503.15 ; D4.0@1088.98,2385.04 1080.9,2376.97 ccw(c1127.95,2329.92) D4.0@1080.85,2376.91 ; D4.0@1148.03,2503.15 ccw(c1129.02,2522.16) 1155.91,2522.16 D4.6@1155.91,2558.27 ; D4.32@1171.65,2329.92 1171.65,2387.07 ccw(c1091,2387.07) D4.0@1148.03,2444.09 ; D4.33@1187.4,2329.92 1187.4,2363.3 ccw(c1087.4,2363.3) 1158.11,2434.01 D4.0@1148.03,2444.09 ; D4.3@1203.15,2558.27 1203.15,2512.65 ccw(c1216.59,2512.65) D4.0@1207.09,2503.15 ; D4.45@1262.2,2483.46 1228.82,2483.46 ccw(c1228.82,2383.46) 1158.11,2454.18 D4.0@1148.03,2444.09
  Bottom Layer w15.75: C21.2@513.78,3433.07 513.78,3364.17 ccw(c515.75,3364.17) v1(515.75,3362.2) ; R29.1@732.28,1586.61 C30.1@830.71,1586.61 v1(830.71,1692.91) ; C13.1@803.15,2620.08 803.15,2651.57 ; C12.2@803.15,2683.07 803.15,2651.57 ; v1(854.33,2653.54) 805.12,2653.54 ccw(c805.12,2651.57) 803.15,2651.57 ; D10.4@1082.87,1629.92 1082.87,1653.74 cw(c1110.24,1653.74) 1110.24,1681.1 v1(1125.98,1681.1) ; v1(1318.9,1688.98) 1318.9,1625.98 D12.4@1319.09,1625.98
  other v1: 1385.24,2075.98 1893.7,2519.68 1519.68,2708.66 1917.32,2767.72 2098.43,2767.72 1066.93,2787.4 1311.02,2818.9 2078.74,2980.32 1913.39,2992.13 2535.43,3086.61 2968.5,3145.67 2590.55,3401.57 2937.01,3413.39 2452.76,3421.26 1681.1,3488.19 1964.57,3488.19
  other v2: 838.58,1755.91 893.7,1842.52 1685.04,1850.39 1535.43,1976.38 1153.54,2031.5 842.52,2035.43 1992.13,2035.43 1885.83,2133.86 2078.74,2137.8 818.9,2220.47 1996.06,2228.35 854.33,2480.32 2338.58,2980.32 2208.66,3003.94 2401.57,3070.87 1822.83,3216.54 2358.27,3216.54 2586.61,3216.54 2232.28,3232.28 2972.44,3279.53 1826.77,3318.9 2807.09,3318.9 1988.19,3326.77 1551.18,3354.33 1200.79,3370.08 2188.98,3370.08 3027.56,3413.39 1834.65,3488.19
DVDD_1V2: C24.1 C25.1 C26.1 C27.1 C34.1 C35.2 D4.7 D4.18 D4.34 D4.44 L7.1 X2.1 | length 4632.3
  Top Layer w7.87: C24.1@915.75,2379.13 cw(c921.45,2384.84) 913.39,2384.84 v1(913.39,2433.07) cw(c959.01,2387.45) 959.01,2451.97 D4.18@1033.86,2451.97 ; C27.1@1126.38,2751.18 1126.38,2696.85 v1(1125.98,2696.85) cw(c1091.77,2662.63) 1140.16,2662.63 D4.7@1140.16,2558.27 ; D4.34@1203.15,2329.92 1203.15,2229.92 ccw(c1204.72,2229.92) v1(1204.72,2228.35) 1204.72,2194.88 ccw(c1224.41,2194.88) C25.1@1224.41,2175.2 ; D4.44@1262.2,2467.72 1318.11,2467.72 ccw(c1318.11,2488.19) 1338.58,2488.19 v1(1338.58,2523.62) C26.1@1387.8,2523.62
  Top Layer w23.62: X2.1@138.19,3434.25 ccw(c152.87,3452.76) 152.8,3429.13 v1(216.54,3429.13) ; C34.1@1435.43,3046.46 cw(c1472.83,3046.46) 1472.83,3083.86 v1(1518.11,3083.86) C35.2@1563.39,3083.86 cw(c1566.14,3083.86) 1566.14,3086.61 1724.41,3086.61 ccw(c1724.41,3112.6) 1750.39,3112.6 L7.1@1750.39,3178.35
  POWER w23.62: v1(216.54,3429.13) 216.54,3263.78 ccw(c271.65,3263.78) 271.65,3208.66 796.98,3208.66 cw(c796.98,3151.31) 854.33,3151.31 854.33,3090.55 ccw(c925.2,3090.55) 925.2,3019.69 1114.73,3019.68 ccw(c1114.73,3030.94) 1125.98,3030.94 ; v1(913.39,2433.07) 838.58,2433.07 cw(c838.58,2456.69) 821.88,2439.99 cw(c838.58,2456.69) 814.96,2456.69 814.96,2670.6 cw(c841.21,2670.6) 841.21,2696.85 v1(1125.98,2696.85) ; v1(1204.72,2228.35) 1299.48,2228.35 ccw(c1299.48,2267.45) 1338.58,2267.45 v1(1338.58,2523.62) ccw(c1287.4,2523.62) 1287.4,2574.8 1157.48,2574.8 cw(c1157.48,2606.3) 1125.98,2606.3 v1(1125.98,2696.85) ; v1(1518.11,3083.86) 1178.9,3083.86 ccw(c1178.9,3030.94) 1125.98,3030.94 ; v1(1125.98,2696.85) 1125.98,3019.68 1125.98,3030.94
DVDD_3V3: C16.1 C17.1 C18.1 C19.1 C20.1 C21.1 C22.1 C23.1 C41.1 C42.2 D4.2 D4.10 D4.23 D4.26 D4.31 D4.42 D4.46 D7.8 D9.1 D10.1 D12.1 L5.1 L10.1 R2.2 R3.2 R4.2 R5.2 R6.2 R18.1 X3.1 | length 10068.2
  Top Layer w7.87: C19.1@862.2,2175.2 862.2,2193.62 cw(c962.2,2193.62) 891.49,2264.33 C17.1@915.75,2288.58 ccw(c918.6,2291.43) 918.6,2287.4 v1(968.5,2287.4) ; D4.23@1033.86,2373.23 995.28,2373.23 ccw(c995.28,2346.46) 968.5,2346.46 v1(968.5,2287.4) ; D4.26@1077.17,2329.92 1077.17,2301.57 cw(c1062.99,2301.57) 1062.99,2287.4 v1(968.5,2287.4) ; v1(1078.74,2606.3) cw(c1044.52,2572.08) 1092.91,2572.08 D4.10@1092.91,2558.27 ; C18.1@1133.86,2175.2 ccw(c1133.86,2197.24) 1155.91,2197.24 D4.31@1155.91,2329.92 ; D4.2@1218.9,2558.27 1218.9,2679.53 cw(c1240.16,2679.53) v1(1240.16,2700.79) C20.1@1240.16,2750 ; D4.42@1262.2,2436.22 1274.02,2436.31 v1(1370.08,2437.01) 1427.84,2437.01 cw(c1427.84,2429.13) 1433.41,2434.7 C23.1@1435.04,2433.07 ; D4.46@1262.2,2499.21 1294.49,2499.21 ccw(c1294.49,2515.75) 1311.02,2515.75 1311.02,2590.55 cw(c1334.65,2590.55) v1(1334.65,2614.17) C22.1@1387.8,2614.17 ; L5.1@1285.43,2023.62 cw(c1280.68,2018.87) 1287.4,2018.87 v1(1287.4,1960.63) ; D7.8@1507.48,1865.2 1507.48,1870.48 cw(c1562.59,1870.48) 1523.62,1909.45 cw(c1566.39,1866.68) 1566.39,1927.17 C16.1@1610.24,1927.17 v1(1610.24,1984.25) R18.1@1610.24,2041.34 ; v1(1948.82,3106.3) cw(c1975.59,3106.3) 1975.59,3133.07 D9.1@2007.09,3133.07
  Top Layer w15.75: X3.1@295.67,3434.25 368.9,3434.25 cw(c368.9,3433.07) v1(370.08,3433.07)
  Top Layer w23.62: R6.2@1315.35,3467.72 R5.2@1405.91,3467.72 R4.2@1496.46,3467.72 1596.33,3467.72 cw(c1596.33,3417.97) 1646.07,3417.19 1646.07,3417.09 v1(1645.67,3366.14) ; C42.2@2340.94,3123.23 v1@2401.57,3123.23 ; v1(2401.57,3125.98) 2428.74,3125.98 cw(c2428.74,3085.83) 2431.5,3125.89 ; L10.1@2423.62,3262.99 cw(c2423.62,3255.12) 2431.5,3255.12 2431.5,3125.89 ; C41.1@2468.9,3085.83 ccw(c2428.74,3085.83) 2431.5,3125.89
  POWER w23.62: v1(370.08,3433.07) 858.27,3433.07 cw(c858.27,3381.89) 909.45,3381.89 909.45,3200.79 ccw(c972.44,3200.79) 972.44,3137.8 1588.36,3137.8 ccw(c1588.36,3195.1) 1645.67,3195.1 v1(1645.67,3366.14) 1882.68,3366.14 cw(c1882.68,3300.01) 1948.82,3300.01 v1(1948.82,3106.3) ; v1(1078.74,2606.3) 1078.74,2633.86 ccw(c1051.18,2633.86) 1051.18,2661.42 944.88,2661.42 ccw(c944.88,2637.8) 921.26,2637.8 921.26,2598.43 ccw(c944.88,2598.43) 944.88,2574.8 cw(c944.88,2551.18) 968.5,2551.18 v1(968.5,2287.4) 968.5,2236.17 ccw(c992.13,2236.22) 992.13,2212.6 v1(1157.48,2212.6) 1157.48,2196.85 ccw(c1185.04,2196.85) 1185.04,2169.29 1287.4,2169.29 ; v1(1240.16,2700.79) 1240.16,2641.73 ccw(c1267.72,2641.73) 1267.72,2614.17 v1(1334.65,2614.17) cw(c1334.65,2578.74) 1370.08,2578.74 v1(1370.08,2437.01) ; v1(1287.4,1960.63) 1287.4,2169.29 ; v1(1610.24,1984.25) 1610.24,2448.82 ; v1(2401.57,3125.98) 2388.81,3113.22 cw(c2372.11,3129.92) 2372.11,3106.3 v1(1948.82,3106.3) ; 1287.4,2169.29 1330.71,2169.29 ccw(c1330.71,2208.66) 1370.08,2208.66 v1(1370.08,2437.01) ; v1(1370.08,2437.01) 1598.43,2437.01 ccw(c1598.43,2448.82) 1610.24,2448.82 ; 1610.24,2448.82 1610.24,3006.3 cw(c1710.24,3006.3) 1710.24,3106.3 v1(1948.82,3106.3)
  Bottom Layer w15.75: v1(370.08,3433.07) C21.1@438.98,3433.07 ; v1(968.5,2287.4) ccw(c968.5,2251.77) 932.87,2251.77 D10.1@932.87,1629.92 932.87,1582.87 ccw(c952.76,1582.87) 952.76,1562.99 1149.61,1562.99 ccw(c1149.61,1582.68) 1169.29,1582.68 1169.29,1625.98 D12.1@1169.09,1625.98 1169.09,1718.7 ccw(c1155.51,1718.7) R3.2@1155.51,1732.28 R2.2@1155.51,1830.71
FLASH_CLK: D4.37 D7.6 | length 712.9
  Top Layer w7.87: D4.37@1262.2,2357.48 1284.25,2357.48 cw(c1284.25,2334.65) 1307.09,2334.65 1307.09,2087.57 ccw(c1347.41,2087.57) 1318.9,2059.06 cw(c1290.38,2030.54) 1330.71,2030.54 1330.71,1826.77 ccw(c1350.39,1826.77) 1350.39,1807.09 1389.76,1807.09 ccw(c1389.76,1826.77) 1409.45,1826.77 1409.45,1863.23 ccw(c1407.48,1863.23) D7.6@1407.48,1865.2
FLASH_CS: D4.41 D7.1 | length 415.9
  Top Layer w7.87: D4.41@1262.2,2420.47 1301.89,2420.47 cw(c1301.89,2320.47) 1372.6,2391.18 1478.19,2285.59 cw(c1407.48,2214.88) 1507.48,2214.88 D7.1@1507.48,2145.04
FLASH_DI: D4.38 D7.5 | length 563.5
  Top Layer w7.87: D4.38@1262.2,2373.23 1288.19,2373.23 cw(c1288.19,2338.58) 1322.83,2338.58 1322.83,2106.3 ccw(c1370.36,2106.3) 1336.75,2072.69 cw(c1284.82,2020.76) 1358.27,2020.76 1358.27,1867.1 cw(c1355.58,1867.1) D7.5@1357.48,1865.2
FLASH_DO: D4.40 D7.2 | length 372.6
  Top Layer w7.87: D4.40@1262.2,2404.72 1290.07,2404.72 cw(c1290.07,2304.72) 1360.79,2375.44 1428.19,2308.03 cw(c1357.48,2237.32) 1457.48,2237.32 D7.2@1457.48,2145.04
FLASH_WP: D4.39 D7.3 R19.1 | length 324.5
  Top Layer w7.87: D4.39@1262.2,2388.98 1289.02,2388.98 cw(c1289.02,2324.46) 1334.65,2370.08 1339.69,2365.03 cw(c1275.85,2301.18) R19.1@1366.14,2301.18 1378.19,2289.13 cw(c1307.48,2218.42) 1407.48,2218.42 D7.3@1407.48,2145.04
GND: C2.2 C5.2 C6.2 C7.2 C9.2 C10.2 C11.2 C14.2 C15.2 C29.2 C30.2 C45.2 C46.2 C47.2 C48.2 C49.2 C50.1 C51.2 C52.2 C53.1 C54.2 C55.2 C56.2 C58.2 C61.2 C62.2 C63.1 C64.1 C65.1 C66.1 C67.1 C69.1 C70.2 C73.2 C74.2 C75.2 C76.2 C77.2 C78.2 C80.2 C81.2 C82.2 C83.2 C84.2 C85.1 C90.2 C92.2 C93.2 C94.2 C95.2 C96.2 C97.2 C99.2 C100.2 C101.1 C102.2 C103.1 C104.2 C105.2 C106.2 C107.2 C108.2 C109.2 C110.2 C111.2 C112.2 C114.2 C115.1 C116.1 C117.2 C118.1 C119.1 C120.2 C121.2 C122.2 C124.2 C125.1 C129.1 C132.2 C133.2 C134.1 C135.2 C136.2 C137.1 C138.2 C139.2 C140.1 C141.2 C142.2 C143.1 C144.1 C145.1 C146.2 C147.2 C148.2 C149.1 C150.2 C151.2 C152.2 C153.2 C154.2 C156.2 C157.2 C158.2 C159.2 C160.2 C162.2 C163.1 C164.1 C165.2 C166.2 C170.2 C171.2 C172.1 C173.2 C174.2 C175.2 C176.2 C177.2 C178.1 C182.2 C183.1 C184.2 C185.2 C186.2 D2.3 D3.2 D5.2 D6.3 D8.9 D8.15 D10.5 D12.5 D13.2 D14.6 D15.2 D16.2 D17.4 D18.2 D20.4 D20.9 D21.2 D22.4 D22.9 D23.2 D25.13 D25.17 D25.21 D25.22 D25.29 D25.30 D25.31 D25.32 D25.39 D25.40 D25.45 D25.47 D26.4 D26.9 D27.4 D27.9 R1.3 R1.4 R11.1 R20.1 R29.2 R53.2 R57.1 R61.1 R81.2 R91.1 R95.1 R99.1 R102.1 R109.1 R115.1 R121.1 R124.1 X5.1 X15.1 X16.1 X17.1 X19.1 | length 1745.5
  Top Layer w7.87: D25.13@1648.03,765.63 1648.03,821.26 cw(c1665.35,821.26) 1665.35,838.58 ; D25.47@1667.72,1094.76 1667.72,1029.14 ccw(c1669.29,1029.14) 1669.29,1027.56 ; D25.45@1707.09,1094.76 1707.09,1021.26 ccw(c1712.6,1021.26) 1712.6,1015.75 ; D25.17@1726.77,765.63 1726.77,844.88 cw(c1728.35,844.88) 1728.35,846.46 ; D25.21@1807.09,767.21 cw(c1805.51,767.21) D25.21@1805.51,765.63 1805.51,840.94 cw(c1807.09,840.94) 1807.09,842.52 ; 1807.09,1031.5 cw(c1807.09,1033.07) 1805.51,1033.07 D25.40@1805.51,1094.76 cw(c1805.51,1093.19) D25.40@1807.09,1093.19 ; D25.22@1825.2,765.63 1825.2,844.88 cw(c1826.77,844.88) v1@1826.77,846.46 ; D25.39@1825.2,1094.76 1825.2,1025.2 ccw(c1826.77,1025.2) 1826.77,1023.62 ; 1834.65,956.69 cw(c1837.68,956.69) 1837.68,959.72 D25.32@1920.87,959.72 ; 1850.39,944.88 ccw(c1855.24,944.88) 1855.24,940.04 D25.31@1920.87,940.04 ; 1854.33,905.51 ccw(c1859.17,905.51) 1859.17,900.67 D25.29@1920.87,900.67 ; 1854.33,921.26 ccw(c1855.24,921.26) 1855.24,920.35 D25.30@1920.87,920.35
  Top Layer w15.75: X5.1@4464.57,1980.32 v2(4527.56,1980.32)
  Bottom Layer w15.75: R91.1@446.85,1933.07 v1(492.13,1933.07) ; R95.1@450.79,908.27 cw(c451.97,908.27) 451.97,909.45 v1(496.06,909.45) ; v1(669.29,1460.63) R29.2@732.28,1460.63 C30.2@830.71,1460.63 ; D10.5@1082.87,1417.32 1082.68,1417.32 1082.68,1366.14 ccw(c1114.17,1366.14) 1114.17,1334.65 v2(1200.79,1334.65) ; D12.5@1319.09,1413.39 1319.09,1377.76 ccw(c1338.58,1377.76) v2(1338.58,1358.27) ; C139.2@2722.44,405.51 2720.47,405.51 cw(c2720.47,448.82) v1(2677.17,448.82) cw(c2716.54,448.82) 2716.54,488.19 C115.1@2722.44,488.19 ; C102.2@2738.19,1389.76 cw(c2738.19,1427.17) 2700.79,1427.17 v1(2700.79,1433.07) 2700.79,1435.04 cw(c2738.19,1435.04) C50.1@2738.19,1472.44
  other v1: 3342.52,161.42 2417.32,240.16 1618.11,334.65 1775.59,342.52 3070.87,444.88 3511.81,452.76 1204.72,594.49 1625.98,622.05 885.83,673.23 1033.46,688.98 807.09,759.84 3868.11,767.72 1161.42,771.65 2700.79,775.59 4379.92,836.61 3868.11,846.46 1683.07,856.3 1751.97,856.3 1830.71,856.3 909.45,874.02 2110.24,909.45 1683.07,935.04 1830.71,935.04 3779.53,935.04 4527.56,935.04 1023.62,948.82 2110.24,948.82 2535.43,968.5 1683.07,1003.94 1751.97,1003.94 1830.71,1003.94 3789.37,1013.78 811.02,1019.69 4527.56,1023.62 3212.6,1051.18 3354.33,1051.18 4169.29,1070.87 2362.2,1151.57 2421.26,1151.57 2480.32,1151.57 1338.58,1250 2098.43,1291.34 2657.48,1385.83 3496.06,1397.64 3818.9,1417.32 3059.06,1429.13 2653.54,1500 2007.87,1525.59 2086.61,1525.59 4488.19,1535.43 3818.9,1555.12 3248.03,1614.17 2527.56,1637.8 3838.58,1811.02 4468.5,1811.02 3877.95,2403.54 4035.43,2403.54 4104.33,2403.54 4519.68,2413.39 4366.14,2417.32 2866.14,2681.1 3023.62,2685.04 2858.27,2885.83 3098.43,2940.94 3500,2944.88 3377.95,2948.82 3444.88,2948.82 3897.64,3279.53 3988.19,3311.02 3374.02,3456.69
  other v2: 1775.59,279.53 2759.84,444.88 2901.57,444.88 2240.16,464.57 2653.54,503.94 2188.98,570.87 1854.33,578.74 3196.85,657.48 3437.01,657.48 3314.96,669.29 2562.99,775.59 3133.86,838.58 3437.01,874.02 2559.06,885.83 2976.38,897.64 1972.44,909.45 1972.44,948.82 2437.01,964.57 2811.02,1007.87 2677.17,1019.69 3437.01,1023.62 3129.92,1082.68 2551.18,1086.61 2515.75,1133.86 1452.76,1149.61 4417.32,1188.98 4094.49,1228.35 1996.06,1271.65 1850.39,1279.53 1433.07,1283.46 2653.54,1299.21 1641.73,1318.9 3980.32,1338.58 3267.72,1358.27 4421.26,1377.95 4267.72,1381.89 2657.48,1448.82 1842.52,1582.68 2007.87,1582.68 3681.1,1625.98 1925.2,1657.48 1736.22,1704.72 1535.43,1712.6 3736.22,1740.16 4043.31,1740.16 4133.86,1744.09 4039.37,1814.96 3929.13,1830.71 2818.9,1862.2 2228.35,1866.14 3263.78,1866.14 2602.36,1877.95 3720.47,1877.95 3803.15,1881.89 4043.31,1893.7 4133.86,1893.7 4220.47,1893.7 2153.54,1944.88 2314.96,1944.88 2818.9,1956.69 3799.21,2019.68 2606.3,2023.62 2181.1,2078.74 2275.59,2078.74 3389.76,2078.74 3870.08,2125.98 4594.49,2153.54 4346.46,2165.35 3224.41,2181.1 4110.24,2244.09 4047.24,2251.97 3299.21,2283.46 4594.49,2283.46 2814.96,2303.15 2622.05,2307.09 4271.65,2318.9 3614.17,2444.88 3826.77,2448.82 3027.56,2464.57 2870.08,2468.5 4598.43,2543.31 3618.11,2645.67 4283.46,2661.42 4610.24,2681.1 3834.65,2685.04 3940.94,2692.91 3818.9,2736.22 3582.68,2897.64 3629.92,3000 3988.19,3074.8 3456.69,3169.29 3889.76,3192.91 4070.87,3192.91 3385.83,3236.22 3578.74,3244.09 3988.19,3279.53 3838.58,3307.09 3704.72,3311.02 4062.99,3342.52 3704.92,3421.06 3818.9,3496.06 3960.63,3496.06 4125.98,3496.06
IN_L: R1.2 R112.1 | length 1444.8
  Top Layer w7.87: v1(4173.23,2007.87) 4173.23,1859.16 ccw(c4181.1,1859.16) 4175.53,1853.6 R112.1@4178.31,1850.82
  Bottom Layer w7.87: v1(4173.23,2007.87) 4192.91,2007.87 ccw(c4192.91,2027.56) 4212.6,2027.56 4212.6,2696.85 cw(c4291.34,2696.85) 4291.34,2775.59 ccw(c4291.34,2814.96) 4330.71,2814.96 4330.71,2944.6 ccw(c4263.5,2944.6) 4311.02,2992.13 cw(c4358.55,3039.65) 4291.34,3039.65 4291.34,3080.71 cw(c4320.87,3080.71) 4320.87,3110.24 4377.56,3110.24 cw(c4377.56,3109.45) R1.2@4378.35,3109.45
IN_R: R1.5 R122.1 | length 1729
  Top Layer w7.87: v1(4084.65,1938.98) cw(c4084.65,1935.86) 4087.76,1935.86 R122.1@4087.76,1850.82
  Bottom Layer w7.87: v1(4084.65,1938.98) cw(c4124.02,1938.98) 4124.02,1978.35 4212.6,1978.35 ccw(c4212.6,1998.03) 4232.28,1998.03 4232.28,2696.85 cw(c4291.34,2696.85) 4291.34,2755.91 4527.56,2755.91 ccw(c4527.56,2785.43) 4557.09,2785.43 4557.09,3061.02 ccw(c4508.66,3061.02) 4508.66,3109.45 R1.5@4476.77,3109.45
NetC5_1: C5.1 C6.1 C7.1 D3.4 L2.1 | length 483.6
  Top Layer w23.62: D3.4@2531.5,1944.88 cw(c2539.37,1944.88) 2539.37,1952.76 C7.1@2683.07,1952.76 ; C6.1@2683.07,1862.2 C7.1@2683.07,1952.76 ; C5.1@2721.64,2167.72 ccw(c2721.64,2129.15) 2683.07,2129.15 L2.1@2683.07,2043.31 C7.1@2683.07,1952.76
NetC8_2: C8.2 D4.48 | length 289.4
  Top Layer w7.87: D4.48@1262.2,2530.71 1282.68,2530.71 ccw(c1282.68,2543.31) 1295.28,2543.31 1295.28,2682.97 cw(c1320.96,2682.97) 1320.96,2708.66 1383.86,2708.66 cw(c1383.86,2704.72) C8.2@1387.8,2704.72
NetC9_1: C9.1 C10.1 C11.1 D5.4 L3.1 | length 471.8
  Top Layer w23.62: D5.4@3212.6,1948.82 ccw(c3224.02,1948.82) 3224.02,1937.4 C11.1@3351.18,1937.4 ; L3.1@3351.18,1846.85 C11.1@3351.18,1937.4 ; C9.1@3392.52,2150 ccw(c3392.52,2108.66) 3351.18,2108.66 C11.1@3351.18,1937.4